# Altium PCB 电磁线圈.PcbDoc
Units mil, origin at the board's own origin, x right, y up, seen from the top; angles counter-clockwise.
Board outline 3742.01 x 2165.62 mil, 2 copper layers (Top Layer, Bottom Layer); 90 components, 47 nets, 244 pads, 60 vias.
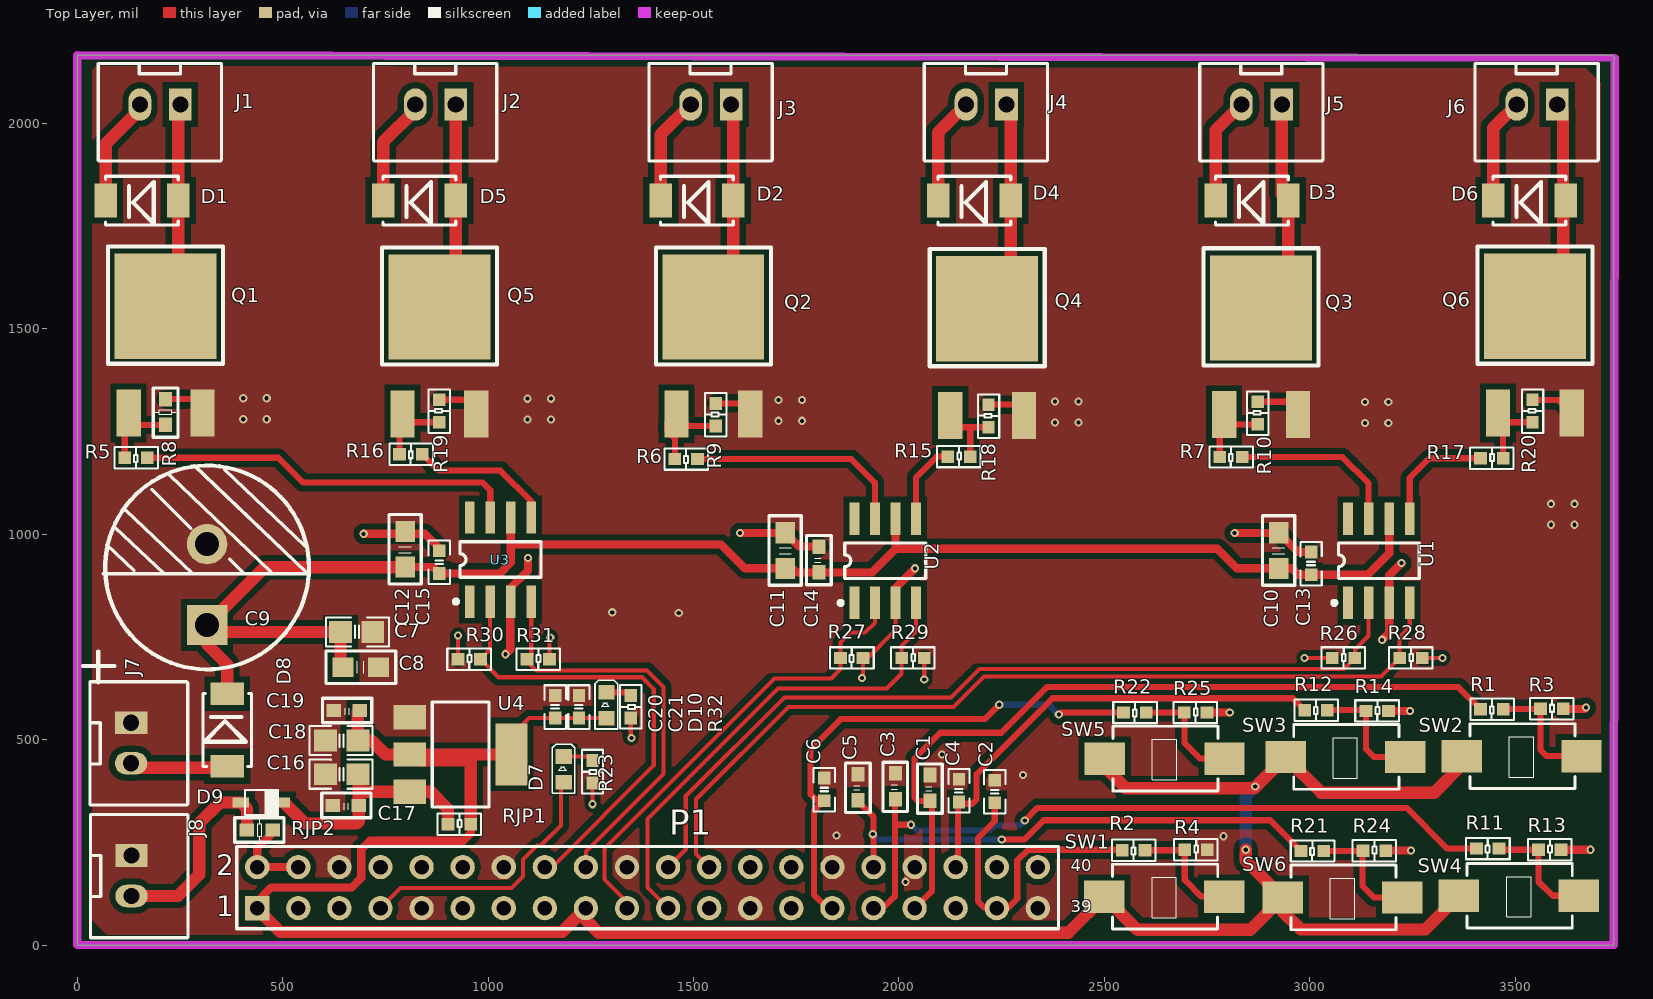
[diagram p0: Top Layer view]
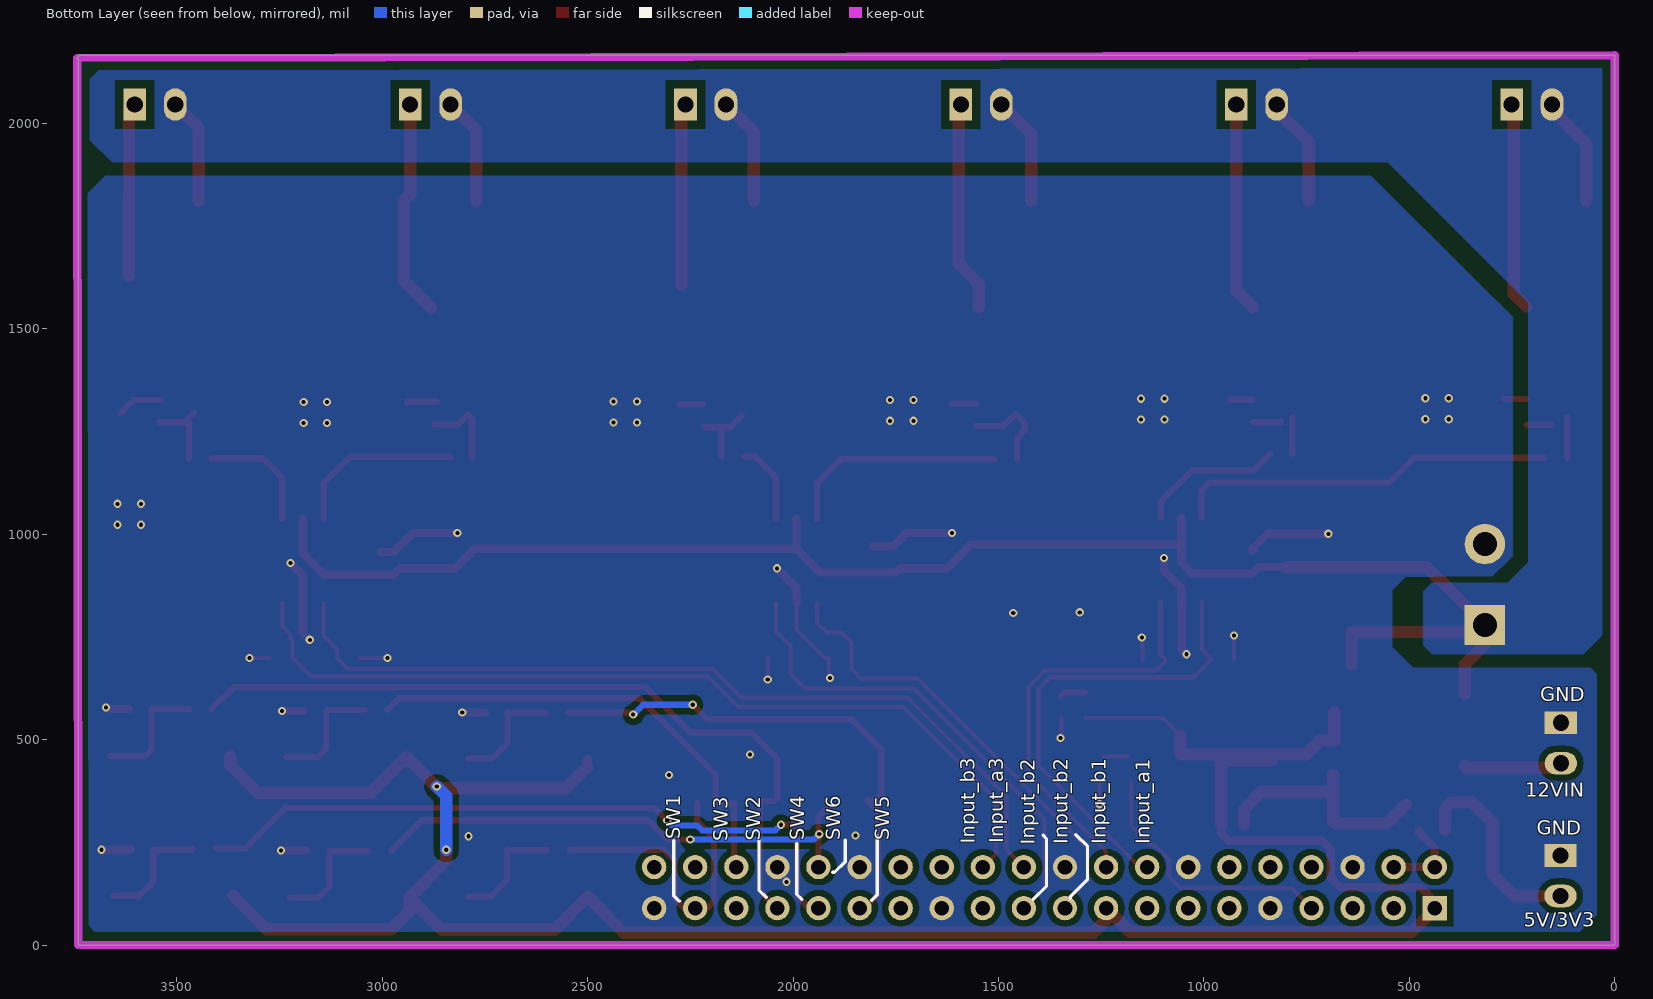
[diagram p1: Bottom Layer view, seen from below]

## Layer stack, top to bottom
Top Layer: signal copper 1.4
Dielectric: dielectric 12.6, FR-4, Dk 4.8
Bottom Layer: signal copper 1.4

## Board outline
1,0 0,1 0,2165.62 3735.27,2165.62 3742.01,2158.88 3740,2156.87 3740,0

## Design rules (kind name [scope] priority, off if disabled: settings)
Clearance [All] p1: gap=5
PlaneConnect [All] p1: planeconnectstyle=Direct reliefexpansion=20 reliefentries=4 reliefconductorwidth=10 reliefairgap=10
PolygonConnect [All] p1: connectstyle=Direct reliefconductorwidth=10 reliefentries=4 polygonreliefangle="90 Angle" airgapwidth=10
RoutingVias [All] p1: holewidth=28 width=50 viastyle="Through Hole" minholewidth=28 minwidth=50 maxholewidth=28 maxwidth=50
SilkToSilkClearance [All] p1: silktosilkclearance=0
SilkToSolderMaskClearance [IsPad] p1: minsilkscreentomaskgap=0 clearancetoexposedcopper=TRUE
SolderMaskExpansion [All] p1: expansion=4
Width [All] p1: maxlimit=50 minlimit=10 preferedwidth=15 minimp=50.000000 maximp=50.000000 favimp=50.000000
25 further rules are at their usual default settings.

## Components (designator, comment, footprint, x,y, rotation, side; value= is the part's Value field where it differs from the comment)
C1 "100nF/0603/100V" C0603#1 2075,350.85 r90 top
C2 "100nF/0603/100V" C0603#2 2233,373.85 r90 top
C3 "100nF/0603/100V" C0603#1 1991,354.79 r90 top
C4 "100nF/0603/100V" C0603#2 2146,375.85 r90 top
C5 "100nF/0603/100V" C0603#1 1900,352.85 r90 top
C6 "100nF/0603/100V" C0603#2 1818,378.85 r90 top
C7 "10uF/25V" C0805#1 680,761.85 r180 top
C8 "100nF/50V" C0805#2 647,676 r0 top
C9 "470uF/16V/ERE1EM471G13OT" EC5X12.5X20V 316,779 r180 top
C10 "10uF/25V" C0805#2 2924,916.85 r90 top
C11 "10uF/25V" C0805#2 1723,916.85 r90 top
C12 "10uF/25V" C0805#2 798,919.85 r90 top
C13 "100nF/0603/100V" C0603#2 3003,928.91 r90 top
C14 "100nF/0603/100V" C0603#1 1805,906.85 r90 top
C15 "100nF/0603/100V" C0603#2 881,931.91 r90 top
C16 "10uF/25V" C0805#1 643.63,415.85 r0 top
C17 "100nF/50V" C0603#1 685,339.85 r180 top
C18 "10uF/25V" C0805#1 643.63,497.85 r0 top
C19 "2.2uF/50V" C0603#1 687,570.85 r180 top
C20 "100nF/50V" C0603#2 1163,579.85 r90 top
C21 "100nF/50V" C0603#2 1221,579.85 r90 top
D1 "MBRS260T3/60V/2A/SMB" SMA 246,1811.85 r180 top
D2 "MBRS260T3/60V/2A/SMB" SMA 1596.8,1811.85 r180 top
D3 "MBRS260T3/60V/2A/SMB" SMA 2947.6,1811.85 r180 top
D4 "MBRS260T3/60V/2A/SMB" SMA 2272.2,1811.85 r180 top
D5 "MBRS260T3/60V/2A/SMB" SMA 921.4,1811.85 r180 top
D6 "MBRS260T3/60V/2A/SMB" SMA 3623,1811.85 r180 top
D7 "" D0603 1184,395.85 r270 top
D8 "MBRS260T3/60V/2A/SMB" SMA 365,434.85 r90 top
D9 "BAT46WS" SOD-323 398,347 r0 top
D10 "" D0603 1288,551.85 r270 top
J1 "Header 2" XH-2.54-2P 251,2045.85 r180 top
J2 "Header 2" XH-2.54-2P 921.2,2045.85 r180 top
J3 "Header 2" XH-2.54-2P 1591.4,2045.85 r180 top
J4 "Header 2" XH-2.54-2P 2261.6,2045.85 r180 top
J5 "Header 2" XH-2.54-2P 2931.8,2045.85 r180 top
J6 "Header 2" XH-2.54-2P 3602,2045.85 r180 top
J7 "Header 2" XH-2.54-2P 131,540.85 r270 top
J8 "2.54" XH-2.54-2P 132,217.85 r270 top
P1 "Header 20*2" HDR2X20 438,89.85 r0 top
Q1 "NMOS" TO-252 125,1294.85 r0 top
Q2 "NMOS" TO-252 1458.2,1292.85 r0 top
Q3 "NMOS" TO-252 2791.4,1290.85 r0 top
Q4 "NMOS" TO-252 2124.8,1288.85 r0 top
Q5 "NMOS" TO-252 791.6,1292.85 r0 top
Q6 "NMOS" TO-252 3458,1294.85 r0 top
R1 "" R0603#1 3443,573.85 r180 top
R2 "" R0603#1 2571,230.85 r180 top
R3 "10K/0603" R0603#1 3589,574.85 r0 top
R4 "10K/0603" R0603#1 2723,231.85 r0 top
R5 "100R/0603" R0603#1 143,1185.85 r180 top
R6 "100R/0603" R0603#1 1482,1182.85 r180 top
R7 "100R/0603" R0603#1 2808,1187.85 r180 top
R8 "10K/0603" R0603#2 215,1265.85 r90 top
R9 "10K/0603" R0603#1 1554,1290.85 r90 top
R10 "10K/0603" R0603#1 2873,1294.85 r90 top
R11 "1K/0603" R0603#1 3433,234.85 r180 top
R12 "1K/0603" R0603#1 3015,571.85 r180 top
R13 "10K/0603" R0603#1 3584,231.85 r0 top
R14 "10K/0603" R0603#1 3164,569.85 r0 top
R15 "100R/0603" R0603#1 2146,1188.85 r0 top
R16 "100R/0603" R0603#1 812,1194.85 r180 top
R17 "100R/0603" R0603#1 3443,1184.85 r0 top
R18 "10K/0603" R0603#1 2218,1287.85 r90 top
R19 "10K/0603" R0603#1 881,1299.85 r90 top
R20 "10K/0603" R0603#1 3542,1299.85 r90 top
R21 "1K/0603" R0603#1 3006,228.85 r180 top
R22 "1K/0603" R0603#1 2574,565.85 r180 top
R23 "" R0603#1 1254,421.85 r270 top
R24 "10K/0603" R0603#1 3157,229.85 r0 top
R25 "10K/0603" R0603#1 2722,565.85 r0 top
R26 "10K/0603" R0603#1 3082,698.85 r0 top
R27 "10K/0603" R0603#1 1885,698.85 r180 top
R28 "10K/0603" R0603#1 3246,698.85 r0 top
R29 "10K/0603" R0603#1 2034,698.85 r0 top
R30 "10K/0603" R0603#1 954,695.85 r0 top
R31 "10K/0603" R0603#1 1122,695.85 r0 top
R32 "" R0603#1 1347,579.85 r270 top
RJP1 "DNP" R0603#1 930,293.85 r0 top
RJP2 "DNP" R0603#2 413,280 r0 top
SW1 "PB" TS-1101-C-W 2648,117.85 r270 top
SW2 "PB" TS-1101-C-W 3518,459.85 r270 top
SW3 "PB" TS-1101-C-W 3089,457.85 r270 top
SW4 "PB" TS-1101-C-W 3511,119.85 r270 top
SW5 "PB" TS-1101-C-W 2649,453.85 r270 top
SW6 "PB" TS-1101-C-W 3082,115.85 r270 top
U1 "TC4427AEOA713" SOIC-8 3093,832.85 r90 top
U2 "TC4427AEOA713" SOIC-8 1891.5,832.85 r90 top
U3 "TC4427AEOA713" SOIC-8 955,835.85 r90 top
U4 "AMS1117" SOT-223 933,463.85 r270 top

## Footprints (in the part's own frame and the unit in brackets; to place one, negate y for a bottom-side part, rotate by r counter-clockwise, add the part's x,y. Pads: shape width x height; smd on the part's side, far side on the other; paste and mask are expansions set on the pad)
C0603#1 [mm]
  rect 0.9x0.8 smd: 1(0,0) 2(1.6,0)
  silkscreen extent -0.76,-0.76 2.29,0.76
C0603#2 [mm]
  rect 0.787x0.762 smd: 1(-0.698,0) 2(0.698,0)
  silkscreen extent -1.36,-0.66 1.33,0.66
C0805#1 [mm]
  rect 1.41x1.35 smd: 1(1,0) 2(-1,0)
  silkscreen extent -2,-0.9 1.9,0.9
C0805#2 [mm]
  rect 1.3x1.2 smd: 1(0,0) 2(2.2,0)
  silkscreen extent -1.05,-1 3.25,1
D0603 [mm]
  rect 0.9x1 smd: A(0,0) K(-1.6,0)
  silkscreen extent -2.36,-0.71 0.66,0.69
EC5X12.5X20V [mm] "100u/250v"
  rect 2.5x2.5 hole 1.5: 1(0,0)
  round 2.5 hole 1.5: 2(0,-5)
  silkscreen extent -6.3,-9.86 7.67,3.56
HDR2X20 [mm] "Connector; Header; 20x2 Position"
  rect 1.5x1.5 hole 0.9: 1(0,0)
  round 1.5 hole 0.9: 2(0,2.54) 3(2.54,0) 4(2.54,2.54) 5(5.08,0) 6(5.08,2.54) 7(7.62,0) 8(7.62,2.54) 9(10.16,0) 10(10.16,2.54) 11(12.7,0) 12(12.7,2.54) 13(15.24,0) 14(15.24,2.54) 15(17.78,0) 16(17.78,2.54) 17(20.32,0) 18(20.32,2.54) 19(22.86,0) 20(22.86,2.54) 21(25.4,0) 22(25.4,2.54) 23(27.94,0) 24(27.94,2.54) 25(30.48,0) 26(30.48,2.54) 27(33.02,0) 28(33.02,2.54) 29(35.56,0) 30(35.56,2.54) 31(38.1,0) 32(38.1,2.54) 33(40.64,0) 34(40.64,2.54) 35(43.18,0) 36(43.18,2.54) 37(45.72,0) 38(45.72,2.54) 39(48.26,0) 40(48.26,2.54)
  silkscreen extent -1.27,-1.27 49.53,3.81
R0603#1 [mil]
  rect 31x30 smd: 1(-27.5,0) 2(27.5,0)
  silkscreen extent -54,-26 52,26
R0603#2 [mil]
  rect 35.43x31.5 smd: 1(0,0) 2(62.99,0)
  silkscreen extent -30,-30 90,30
SMA [mil]
  rect 55x82.68 smd: 1(0,0) 2(177.01,0)
  silkscreen extent 0,-59 177,59
SOD-323 [mil]
  rect 40x25 smd: 1(0,0) 2(100,0)
  silkscreen extent 10,-30 90,30
SOIC-8 [mm]
  rect 2x0.6 smd: 1(0,0) 2(0,-1.27) 3(0,-2.54) 4(0,-3.81) 5(5.2,-3.81) 6(5.2,-2.54) 7(5.2,-1.27) 8(5.2,0)
  silkscreen extent -0.12,-4.41 3.7,0.97
SOT-223 [mm]
  rect 1.5x2 smd: 1(-2.3,-3.15) 2(0,-3.15) 3(2.3,-3.15)
  rect 3.81x2 smd: 4(0,3.15)
  silkscreen extent -3.25,-1.75 3.25,1.75
TO-252 [mm]
  rect 1.5x2.9 smd: 1(0,0) 3(4.56,0)
  rect 6.3x6.5 smd: 2(2.28,6.6)
  silkscreen extent -1.27,3.05 5.84,10.29
TS-1101-C-W [mm] "TS-1101-C-W"
  rect 2x2.5 smd: 1(0,3.637) 2(0,-3.763)
  silkscreen extent -2,-3.26 2,3.24
XH-2.54-2P [mm]
  rect 1.4x2 hole 1: 1(0,0)
  oval 1.4x2 hole 1: 2(2.5,0)
  silkscreen extent -2.54,-2.54 5.08,3.5

## Part data
C1 C2 C3 C4 C5 C6 C13 C14 C15: library part "CAP CER 100nF 10% 50V 0603 X7R", "C408909"
C7 C8 C16 C17 C18 C19 C20 C21: library part Cap
C9: library part "Cap Pol3", "C105289"
C10 C11 C12: library part "CAP CER 100nF 10% 50V 0603 X7R"
D1 D2 D3 D4 D5 D6 D8: library part "Diode Schottky"
D7 D10: library part LED
D9: library part Diode_75V_150mA_1N4148WS, "C2991954"
J1 J2 J3 J4 J5 J6 J7: "Header, 2-Pin"
J8: library part "Header 2", "Header, 2-Pin"
P1: library part "Header 18X2_1", "Header, 18-Pin, Dual row"
Q1 Q2 Q3 Q4 Q5 Q6: "NCE6020AK"
R1 R2 R3 R4 R5 R6 R7 R8 R9 R10 R11 R12 R13 R14 R15 R16 R17 R18 R19 R20 R21 R22 R23 R24 R25 R26 R27 R28 R29 R30 R31 R32 RJP1 RJP2: library part RES2
SW1 SW2 SW3 SW4 SW5 SW6: library part PushButton_TS-1101-C-W, "C318938"
U1 U2 U3: library part UCC37324

## Via types
v1: diameter 20, hole 10, Top Layer to Bottom Layer, 60 vias

## Nets (pads, with @x,y where several pads share a name; then routed paths per layer and width w, separated by ;. In a path a pad name is that pad's centre, name@x,y a point inside that pad or via, vN(x,y) a via of type N, cw(c..) or ccw(c..) an arc to the next point about the centre after c; other vN are vias at no path point)
GATE_A1: R5.1 U3.7 | length 933.5
  Top Layer w15: R5.1 489,1185.85 549,1125.85 986,1125.85 1005,1106.85 U3.7
GATE_A2: R6.1 U2.7 | length 543.6
  Top Layer w15: R6.1 1884,1182.85 1941.5,1125.35 U2.7
GATE_A3: R7.1 U1.7 | length 420.3
  Top Layer w15: R7.1 3079,1187.85 3143,1123.85 U1.7
GATE_B1: R16.1 U3.5 | length 352.4
  Top Layer w15: R16.1 879.5,1154.85 1030,1154.85 1105,1079.85 U3.5
GATE_B2: R15.1 U2.5 | length 198.7
  Top Layer w15: U2.5 2041.5,1138.35 2092,1188.85 R15.1
GATE_B3: R17.1 U1.5 | length 291.7
  Top Layer w15: U1.5 3243,1136.85 3291,1184.85 R17.1
GND: C1.2 C2.2 C3.2 C4.2 C5.2 C6.2 C7.2 C8.2 C9.2 C10.2 C11.2 C12.2 C13.2 C14.2 C15.2 C16.2 C17.2 C18.2 C19.2 C20.2 C21.2 J7.1 J8.1 P1.6 P1.9 P1.14 P1.20 P1.25 P1.30 P1.34 P1.39 Q1.3 Q2.3 Q3.3 Q4.3 Q5.3 Q6.3 R3.2 R4.2 R8.2 R9.2 R10.2 R13.2 R14.2 R18.2 R19.2 R20.2 R23.2 R24.2 R25.2 R26.1 R27.1 R28.2 R29.2 R30.1 R31.2 R32.2 U1.3 U2.3 U3.3 U4.1 | length 2497.9
  Top Layer w10: R30.1 v1(926.5,753.35) ; R31.2 1149.5,747.35 v1(1151,748.85) ; v1(1254,342.85) R23.2 ; v1@1347,505.85 R32.2 ; v1@1910,650.85 1912.5,653.35 R27.1 1924,698.85 1991.5,766.35 U2.3 ; v1(2061.5,646.35) R29.2 ; v1(2987,698.85) R26.1 ; R28.2 v1(3323,698.85)
  Top Layer w15: R8.2 270.54,1328.84 ; R19.2 936.63,1327.35 ; R9.2 Q2.3@1612.23,1318.35 ; R18.2 Q4.3@2277.83,1315.35 ; R10.2@2866,1322.35 2939.43,1322.35 ; R20.2@3537,1326.35 3606.03,1326.35 Q6.3
  Top Layer w20: v1(697,1000.85) 846,1000.85 881,965.85 C15.2 ; v1(1042,707.85) 1054,719.85 1054,834.85 U3.3 1055,869.85 1097,911.85 v1(1097,941.85) ; v1(1613,1002.85) 1723.61,1002.85 1756.62,969.84 C14.2 ; U2.3 1991.5,869.39 v1(2039,916.85) ; R25.2 v1(2805,565.85) ; v1(2817,1002.85) 2924.61,1002.85 2971.05,956.41 C13.2 ; v1(3176,742.85) 3193,759.85 U1.3 3193,899.85 v1(3223,929.85) ; R24.2 v1(3246,229.85) ; R14.2 v1(3244,569.85) ; R13.2 v1(3683,231.85) ; R3.2 3669,574.85 v1(3672,577.85)
  other v1: 2016,153.85 2790,264.85 1848,266.85 2302,413.85 2105,463.85 1349,503.85 1910,649.85 1464,807.85 1302,809.85 3587,1022.85 3644,1022.85 3587,1073.85 3644,1073.85 3134,1270.85 3191,1270.85 2380,1271.85 2437,1271.85 1707,1275.85 1764,1275.85 1096,1278.85 1153,1278.85 404,1279.85 461,1279.85 3134,1321.85 3191,1321.85 2380,1322.85 2437,1322.85 1707,1326.85 1764,1326.85 1096,1329.85 1153,1329.85 404,1330.85 461,1330.85
INPUT_A1: P1.16 R30.2 U3.2 | length 1154.8
  Top Layer w10: U3.2 1005,719.35 R30.2 1025.5,651.85 1374,651.85 1403,622.85 1403,436.85 1161,194.85 1145,194.85 1140,189.85 P1.16
INPUT_A2: P1.19 R27.2 U2.2 | length 1140.5
  Top Layer w10: P1.19 1338,104.85 1283,159.85 1283,234.85 1697.15,649 1835.15,649 1857.5,671.35 R27.2 1857.5,736.35 1881.5,760.35 1917.5,760.35 1941.5,784.35 U2.2
INPUT_A3: P1.22 R26.2 U1.2 | length 2106.5
  Top Layer w10: P1.22 1481,232.85 1481,363 1720.85,602.85 2127,602.85 2196.15,672 3082.65,672 R26.2 3109.5,719.35 3143,752.85 U1.2
INPUT_B1: P1.18 R31.1 U3.4 | length 1025.8
  Top Layer w10: U3.4 1105,706.35 R31.1 1094.5,690.35 1117,667.85 1387,667.85 1427,627.85 1427,416.85 1238,227.85 1238,192.85 P1.18@1235,189.85
INPUT_B2: P1.21 R29.1 U2.4 | length 1189.6
  Top Layer w10: P1.21 1388,139.85 1388,306.85 1705.15,624 1970.15,624 2006.5,660.35 R29.1 2006.5,728.35 2041.5,763.35 U2.4
INPUT_B3: P1.24 R28.1 U1.4 | length 2177.4
  Top Layer w10: P1.24 1506,221.85 1506,354.85 1731,579.85 2132.85,579.85 2207,654 3173.65,654 R28.1 3218.5,742.92 3223,747.42 3223,754.85 3243,774.85 U1.4
LED_RUN: D7.A P1.7 | length 651.3
  Top Layer w10: P1.7 787,138.85 1057,138.85 1085,166.85 1085,207.85 1119,241.85 1128,241.85 1177,290.85 D7.A@1177,395.85
NetC16_1: C16.1 C17.1 D9.2 RJP1.1 U4.3 | length 583.9
  Top Layer w20: 685,375.85 687.55,373.3
  Top Layer w30: D9.2@508.07,341.93 554.15,295.85 680,295.85 685,300.85 C17.1 685,375.85 C16.1@685,413.85 ; 687.55,373.3 U4.3 859.55,373.3 902.5,330.35 RJP1.1
NetD1_1: D1.1 J1.1 Q1.2 | length 506.2
  Top Layer w30: Q1.2 246,1585.93 D1.1 246,2040.85 J1.1
NetD2_1: D2.1 J3.1 Q2.2 | length 508
  Top Layer w30: Q2.2 1547.96,1609.81 1596.8,1658.65 D2.1 J3.1@1596.8,2040.45
NetD3_1: D3.1 J5.1 Q3.2 | length 529.2
  Top Layer w30: Q3.2 2947.6,1617.13 D3.1 2931.8,1827.65 J5.1
NetD4_1: D4.1 J4.1 Q4.2 | length 428.9
  Top Layer w30: Q4.2@2272.2,1606.33 D4.1 J4.1@2272.2,2035.25
NetD5_1: D5.1 J2.1 Q5.2 | length 509.8
  Top Layer w30: Q5.2 921.4,1592.73 D5.1 921.4,2045.65 J2.1
NetD6_1: D6.1 J6.1 Q6.2 | length 421.8
  Top Layer w30: J6.1 3616,2031.85 3616,1818.85 3617,1811.85 Q6.2@3617,1629.93
NetD7_K: D7.K R23.1 | length 60.5
  Top Layer w10: D7.K R23.1@1244.51,458.84
NetD8_1: D8.1 J7.2 | length 239.6
  Top Layer w30: J7.2 141.57,431.85 362,431.85 D8.1
NetD10_K: D10.K R32.1 | length 62.1
  Top Layer w15: D10.K 1339.51,614.84 R32.1
NetQ1_1: Q1.1 R5.2 R8.1 | length 160.5
  Top Layer w15: R5.2 Q1.1@115.5,1285.35 ; Q1.1@154,1265.85 R8.1
NetQ2_1: Q2.1 R6.2 R9.1 | length 234.9
  Top Layer w15: R6.2 1454.5,1234.07 1436,1252.57 1436,1270.65 Q2.1 1487.7,1263.35 R9.1
NetQ3_1: Q3.1 R7.2 R10.1 | length 198.8
  Top Layer w15: R7.2 2780.5,1279.95 Q3.1 2814.9,1267.35 R10.1
NetQ4_1: Q4.1 R15.2 R18.1 | length 176.7
  Top Layer w15: Q4.1 2153.3,1260.35 2173,1260.35 ; R15.2 2173.5,1259.85 2173,1260.35 ; R18.1 2173,1260.35
NetQ5_1: Q5.1 R16.2 R19.1 | length 159.8
  Top Layer w15: R16.2 Q5.1@784.5,1285.75 ; Q5.1@812.1,1272.35 R19.1
NetQ6_1: Q6.1 R17.2 R20.1 | length 190.8
  Top Layer w15: Q6.1 Q6.1@3470.5,1282.35 ; R17.2 Q6.1@3470.5,1282.35 ; R20.1 3480.5,1272.35 Q6.1@3470.5,1282.35
NetR1_1: R1.1 R3.1 SW2.1 | length 297.6
  Top Layer w15: R1.1 3471.5,574.85 R3.1 3561.5,474.35 3576,459.85 SW2.1
NetR2_1: R2.1 R4.1 SW1.1 | length 283.4
  Top Layer w15: R2.1 2694.5,230.85 R4.1 2695.5,158.35 2736,117.85 SW1.1
NetR11_1: R11.1 R13.1 SW4.1 | length 286.7
  Top Layer w15: R11.1 3463.5,231.85 R13.1 3556.5,154.35 3591,119.85 SW4.1
NetR12_1: R12.1 R14.1 SW3.1 | length 288.3
  Top Layer w15: R12.1 R14.1@3134.5,571.85 ; R14.1 3136.5,477.35 3156,457.85 SW3.1
NetR21_1: R21.1 R24.1 SW6.1 | length 288.6
  Top Layer w15: R21.1 3128.5,228.85 3128.5,143.35 3156,115.85 SW6.1
NetR22_1: R22.1 R25.1 SW5.1 | length 280.1
  Top Layer w15: R22.1 R25.1 2694.5,492.35 2733,453.85 SW5.1
SW_DECT1: C2.1 P1.37 R2.2 | length 728.8
  Top Layer w15: C2.1 2233,301.35 2192,260.35 2192,106.85 2209,89.85 P1.37 2265,89.85 2288,112.85 2288,205.85 2314.03,231.88 2542.47,231.88 R2.2
SW_DECT2: C1.1 P1.33 R1.2 | length 1882.8
  Top Layer w15: P1.33 2039,89.85 2080.03,130.88 C1.1@2080.03,348.82 ; 2038,453.85 2038,358.85 2046,350.85 C1.1 C1.1@2077.03,348.82 ; 2041,456.85 2101,516.85 2249,516.85 2360,627.85 3361.5,627.85 R1.2
SW_DECT3: C4.1 P1.36 R12.2 | length 1156.7
  Top Layer w15: P1.36 2144,195.85 C4.1@2144,343.85 ; C4.1@2141.5,343.85 C4.1@2144,343.85 ; R12.2 2958.5,600.85 2374,600.85 2189,415.85 2189,354.85 2178,343.85 C4.1@2144,343.85
SW_DECT4: C3.1 P1.31 R11.2 | length 1786.7
  Top Layer w15: P1.31 1961,89.85 1990,118.85 1990,292.85 ; C3.1@1987,350.79 C3.1 ; C3.1@1990,350.79 1990,292.85 ; v1(2029,292.85) 1990,292.85 ; v1(2306,302.85) 2337,333.85 3236,333.85 3335,234.85 R11.2
  Bottom Layer w15: v1(2029,292.85) 2043,278.85 2221,278.85 2233,290.85 2294,290.85 v1(2306,302.85)
SW_DECT5: C6.1 P1.29 R22.2 | length 1265.2
  Top Layer w15: P1.29 1826,89.85 1793,122.85 1793,326.35 C6.1 1800.5,351.35 1785,366.85 1785,476.85 1858,549.85 2209,549.85 v1(2244,584.85) ; v1(2389,560.85) 2394,565.85 R22.2
  Bottom Layer w15: v1(2244,584.85) 2365,584.85 v1(2389,560.85)
SW_DECT6: C5.1 P1.32 R21.2 | length 1267.1
  Top Layer w15: C5.1@1905,344.85 1938,311.85 P1.32 ; v1(2250,256.85) 2305,256.85 2352,303.85 2903.5,303.85 R21.2
  Bottom Layer w15: v1(1936,269.85) 1949,256.85 v1(2250,256.85)
VDD3V3: C18.1 C19.1 C20.1 C21.1 D10.A P1.1 P1.17 RJP1.2 SW1.2 SW2.2 SW3.2 SW4.2 SW5.2 SW6.2 U4.2 U4.4 | length 6248.7
  Top Layer w10: U4.4@1057.02,509.87 1099.5,552.35 C20.1 C21.1 1287.5,552.35 D10.A
  Top Layer w20: P1.1@438,87.85 P1.1 438,105.85 472,139.85 668,139.85 691,162.85 691,232.85 712,253.85 940,253.85 957.5,271.35 RJP1.2 ; P1.17@1238,60.85 P1.17 ; SW5.2@2500.83,433.02 SW5.2
  Top Layer w30: P1.1@438,87.85 494,31.85 1180,31.85 P1.17 ; C19.1@683,566.85 C18.1 716,497.85 750,463.85 U4.2 U4.4 U4.4@1057.02,509.87 ; U4.2@834,449.85 957.5,449.85 RJP1.2 ; P1.17@1238,60.85 1268.85,30 2411.98,30 SW1.2 2580.83,36.85 2854.83,36.85 SW6.2 ; SW5.2@2500.83,433.02 2552,381.85 2864.83,381.85 SW3.2 3027.83,370.85 3303,370.85 3369.83,437.68 SW2.2 ; v1(2844,231.85) 2844,205.68 SW6.2 ; SW4.2 3280.83,37.85 2978,37.85 2933.83,82.02 SW6.2
  Bottom Layer w30: v1(2844,231.85) 2844,362.85 v1(2867,385.85)
VDD5V: P1.2 P1.4 RJP2.2 | length 205.9
  Top Layer w20: RJP2.2 475.99,274.17 438,236.18 P1.2 P1.4
VDD-5V: 
VDD-12V: C7.1 C8.1 C9.1 C10.1 C11.1 C12.1 C13.1 C14.1 C15.1 D1.2 D2.2 D3.2 D4.2 D5.2 D6.2 D8.2 J1.2 J2.2 J3.2 J4.2 J5.2 J6.2 U1.6 U2.6 U3.6 | length 5450.3
  Top Layer w20: C12.1 865.56,919.85 C15.1 1028.56,904.41 1055,930.85 1055,974.85 ; U3.6 1055,974.85 ; U2.6 1991.5,964.35 ; U1.6 3193,952.85 3141.56,901.41 C13.1 2971.44,901.41 2956,916.85 C10.1 2823,916.85 2775.5,964.35 1991.5,964.35 ; 1055,974.85 1567,974.85 1625,916.85 C11.1 1741,916.85 1751,906.85 C14.1 1934,906.85 1991.5,964.35
  Top Layer w30: D1.2 68.99,1949.84 152.57,2033.43 J1.2 ; C9.1@316,732 365,683 D8.2 ; C8.1@640.63,682.85 C7.1 333.15,761.85 C9.1 456.85,919.85 C12.1 ; D5.2 744.39,1954.24 822.77,2032.63 J2.2 ; D2.2 1419.79,1972.67 J3.2 ; D4.2 2095.19,1977.87 J4.2 ; D3.2 2770.59,1983.07 J5.2 ; D6.2 3445.99,1988.27 J6.2
VIN: D9.1 J8.2 RJP2.1 | length 506.7
  Top Layer w30: J8.2 244.57,119.43 297,171.85 297,296.85 347.15,347 D9.1 413,332 RJP2.1
pads on no net: P1.3 P1.5 P1.8 P1.10 P1.11 P1.12 P1.13 P1.15 P1.23 P1.26 P1.27 P1.28 P1.35 P1.38 P1.40 U1.1 U1.8 U2.1 U2.8 U3.1 U3.8

## Polygon pours and split planes (outlines as drawn)
GND on Bottom Layer "Top Overlay-No Net" (solid, pour order 12): 361.58,31.85 84.69,31.85 50.95,65.41 44,72.32 44,183.87 44,659.67 49.95,665.59 58.89,674.47 419.14,674.47 490.59,674.47 538.23,721.86 541.21,724.82 541.21,841.3 541.21,864 513.42,891.64 508.46,896.58 340.74,896.58 298.06,896.58 256.38,938.04 248.44,945.93 248.44,1003.19 248.44,1529.33 332.8,1613.23 593.81,1872.85 1045.36,1872.85 3673.33,1872.85 3716,1830.4 3716,1518.47 3716,49.62 3699.13,32.84
VDD-12V on Bottom Layer "Top Overlay-No Net" (solid, pour order 8): 397,707.85 76,707.85 18,765.85 14,769.85 14,861.85 14,2139.85 27,2152.85 120,2152.85 3666,2152.85 3712,2106.85 3724,2094.85 3724,1971.85 3657,1904.85 3295,1904.85 552,1904.85 330,1682.85 210,1562.85 210,931.85 260,881.85 291,881.85 445,881.85 456,870.85 466,860.85 466,802.85 466,729.85 444,707.85
GND on Top Layer "Top Overlay-No Net" (solid, remove dead copper, pour order 14): 966.11,19.8 77.11,19.8 39.11,57.8 36.11,60.8 36.11,212.8 36.11,2129.8 53.11,2146.8 56.11,2149.8 189.11,2149.8 3655.11,2149.8 3710.11,2094.8 3708.11,2092.8 3708.11,25.8

## Keep-outs
Keep-Out Layer:
  lines w20: 0,0 0,2165.62 3739,2158.88 ; 1,0 3740,0 ; 3739.8,7.86 3742.01,2158.88

## Silkscreen, mask and mechanical layers (free items; w line width, h text height)
Bottom Overlay:
  lines w8: 1312,269 1283,240 1283,160 1325,118 1325,114 ; 1391,267 1383,259 1383,143 1415,111 ; 1795,266 1795,122 1808,109 ; 1873,255 1873,203 1899,177 1903,177 ; 1979,111 1991,123 1991,247 ; 2065,116 2083,134 2083,255 ; 2275,107 2277,107 2290,120 2290,254
  text "GND" at 181,581 h60
  text "12VIN" at 218,349 h60
  text "SW1" at 2262,257 h60 r270
  text "GND" at 190,256 h60
  text "SW5" at 1753,255 h60 r270
  text "SW6" at 1873,255 h60 r270
  text "SW4" at 1960,255 h60 r270
  text "SW2" at 2067,254 h60 r270
  text "SW3" at 2147,253 h60 r270
  text "Input_a3" at 1476,248 h60 r270
  text "Input_b3" at 1546,246 h60 r270
  text "Input_a1" at 1120,245 h60 r270
  text "Input_b1" at 1227,245 h60 r270
  text "Input_b2" at 1319,245 h60 r270
  text "Input_b2" at 1400,244 h60 r270
  text "5V/3V3" at 222,32 h60

## Text inside footprints (layer, text, board x,y; h text height)
P1: Top Overlay "1" at 338,69.85 h50; Top Overlay "2" at 338,169.85 h50; Top Overlay "40" at 2418,169.85 h50; Top Overlay "39" at 2418,69.85 h50
SW1: Mechanical 14 "2" at 2509.83,-32.95 h8; Mechanical 14 "1" at 2801.17,-32.95 h8
SW2: Mechanical 14 "1" at 3661.17,463.05 h8; Mechanical 14 "2" at 3375.83,349.05 h8
SW3: Mechanical 14 "2" at 2946.83,347.05 h8; Mechanical 14 "1" at 3238.17,347.05 h8
SW4: Mechanical 14 "2" at 3372.83,-30.95 h8; Mechanical 14 "1" at 3658.17,83.05 h8
SW5: Mechanical 14 "2" at 2506.83,343.05 h8; Mechanical 14 "1" at 2798.17,343.05 h8
SW6: Mechanical 14 "2" at 2943.83,-34.95 h8; Mechanical 14 "1" at 3235.17,-34.95 h8